# Altium PCB PMI_ActionV2.PcbDoc
Units mm, origin at the board's own origin, x right, y up, seen from the top; angles counter-clockwise.
Board outline 94 x 65 mm, 2 copper layers (Top Layer, Bottom Layer); 78 components, 57 nets, 244 pads, 0 vias.
Unrouted connection lines stored in the file: 173.
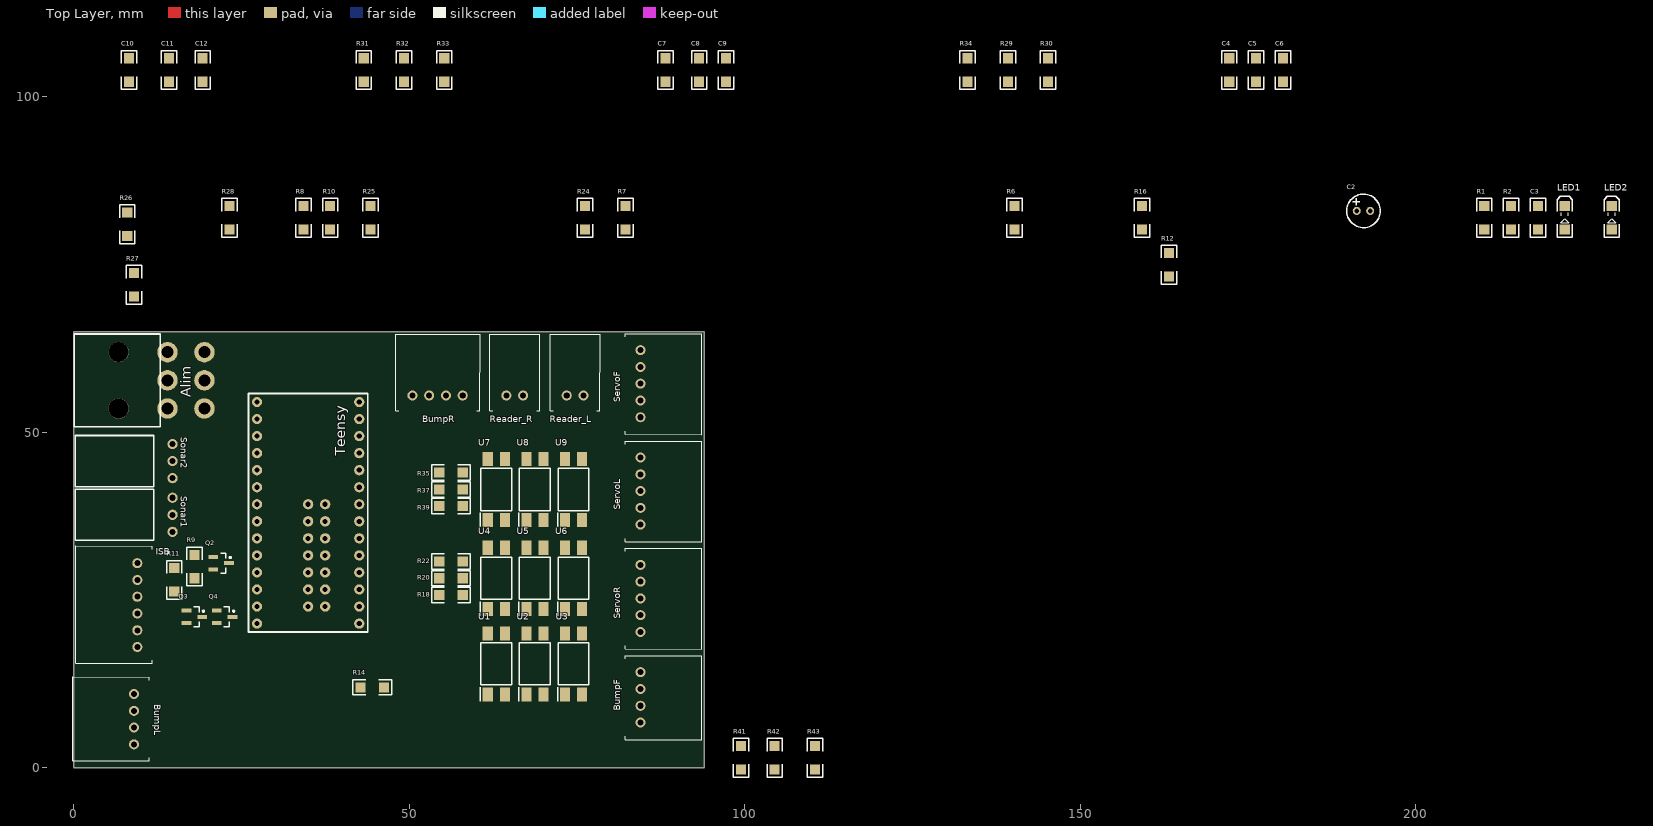
[diagram p0: Top Layer view]
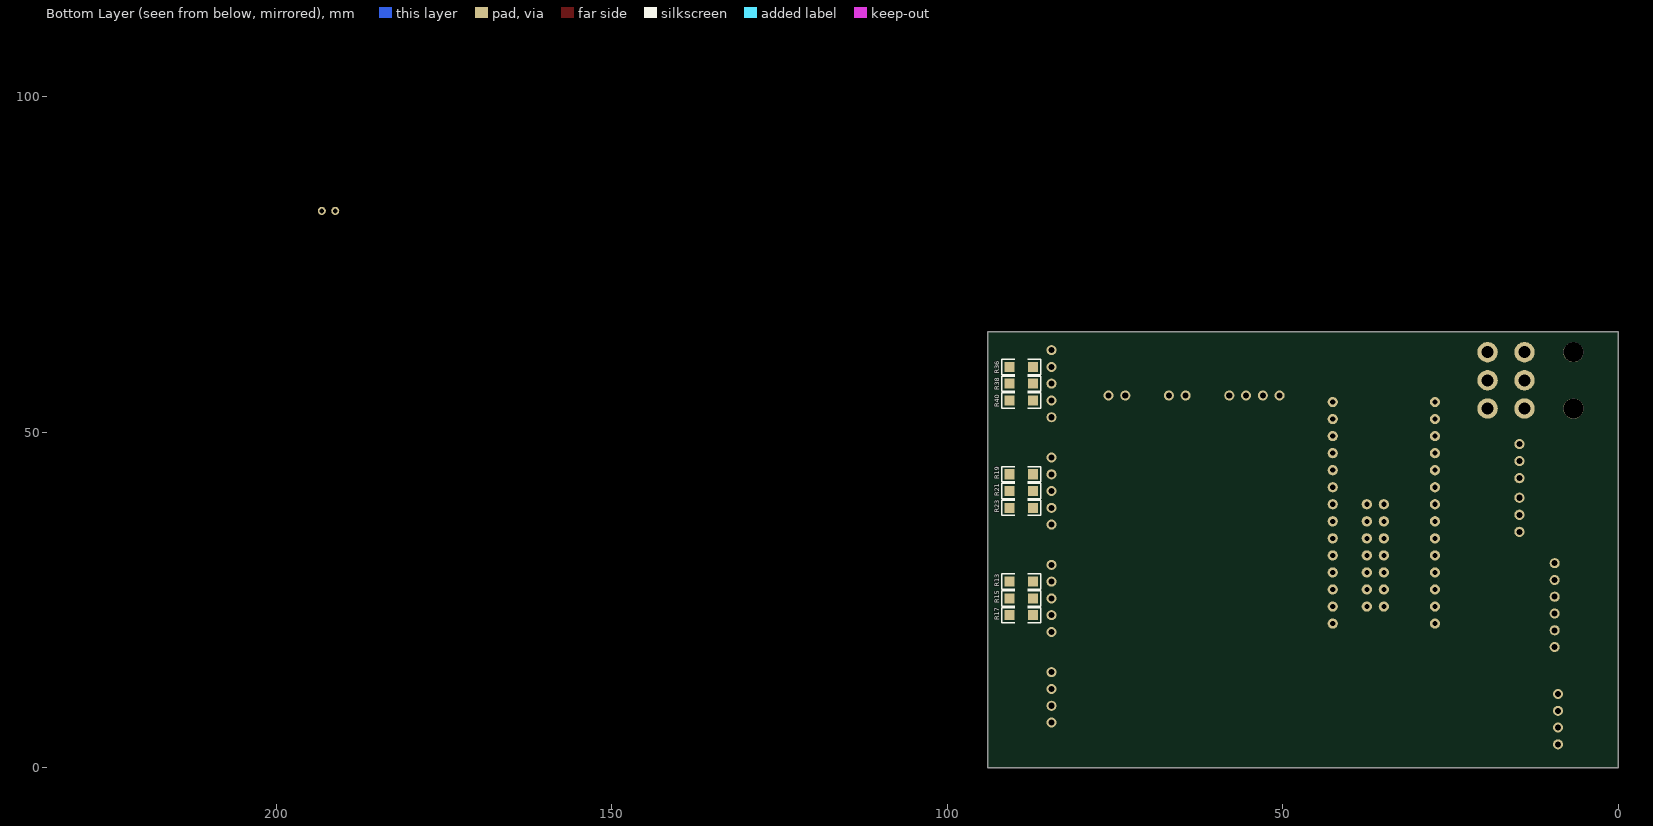
[diagram p1: Bottom Layer view, seen from below]

## Layer stack, top to bottom
Top Solder: solder mask 0.0102, Solder Resist, Dk 3.5
Top Layer: signal copper 0.0356
Dielectric 1: dielectric 0.32, FR-4, Dk 4.8
Bottom Layer: signal copper 0.0356
Bottom Solder: solder mask 0.0102, Solder Resist, Dk 3.5

## Board outline
0,0 0,65 94,65 94,0

## Design rules (kind name [scope] priority, off if disabled: settings)
Clearance [All] p1: gap=0.254
HoleSize [All] p1: absolutevalues=TRUE maxlimit=5 minlimit=0.025 maxpercent=80.000 minpercent=20.000
PolygonConnect [All] p1: connectstyle=Relief reliefconductorwidth=0.254 reliefentries=4 polygonreliefangle="90 Angle" airgapwidth=0.254
RoutingVias [All] p1: holewidth=0.711 width=1.27 viastyle="Through Hole" minholewidth=0.711 minwidth=1.27 maxholewidth=0.711 maxwidth=1.27
SolderMaskExpansion [All] p1: expansion=0.102
Width [All] p1: maxlimit=3 minlimit=0.254 preferedwidth=0.4
29 further rules are at their usual default settings.

## Classes and differential pairs
component class PMI_Action: Alim C2 C3 ISB LED1 LED2 Q2 Q3 Q4 R1 R2 R6 R7 R8 R9 R10 R11 R12 R13 R14 R15 R16 R17 R18 R19 R20 R21 R22 R23 R24 R25 R26 R27 R28 Reader_L Reader_R S1 S2 S3 S4 Sonar1 Sonar2 Teensy U1 U2 U3 U4 U5 U6
component class PMI_Action_bumpers: BumpF BumpL BumpR C4 C5 C6 C7 C8 C9 C10 C11 C12 R29 R30 R31 R32 R33 R34 R35 R36 R37 R38 R39 R40 R41 R42 R43 ServoF ServoL ServoR U7 U8 U9

## Components (designator, comment, footprint, x,y, rotation, side; value= is the part's Value field where it differs from the comment)
Alim "Header 3X2H" MOLEX_MINIFITJR_3X2 14,57.75 r270 top
BumpF "Header 4H" S4B-XH-A 84.5,14.25 r270 top
BumpL "Header 4H" S4B-XH-A 9,3.5 r90 top
BumpR "Header 4H" S4B-XH-A 50.5,55.5 r0 top
C2 "Cap2" Capacitor 191.243,83 r0 top
C3 "(optional)" "Capacitor 1206" 218.243,82 r90 top
C4 "(optional)" "Capacitor 1206" 172.243,104 r90 top
C5 "(optional)" "Capacitor 1206" 176.243,104 r90 top
C6 "(optional)" "Capacitor 1206" 180.243,104 r90 top
C7 "(optional)" "Capacitor 1206" 88.243,104 r90 top
C8 "(optional)" "Capacitor 1206" 93.243,104 r90 top
C9 "(optional)" "Capacitor 1206" 97.243,104 r90 top
C10 "(optional)" "Capacitor 1206" 8.243,104 r90 top
C11 "(optional)" "Capacitor 1206" 14.243,104 r90 top
C12 "(optional)" "Capacitor 1206" 19.243,104 r90 top
ISB "Header 6H" S6B-XH-A 9.5,18 r90 top
LED1 "5V_L" KP-3216SEC 222.243,82 r90 top
LED2 "5V_A" KP-3216SEC 229.243,82 r90 top
Q2 "MOSFET-N" SOT23_M 22,30.5 r0 top
Q3 "MOSFET-N" SOT23_M 18,22.5 r0 top
Q4 "MOSFET-N" SOT23_M 22.5,22.5 r0 top
R1 "Res2" "Resistor 1206" 210.243,82 r90 top
R2 "Res2" "Resistor 1206" 214.243,82 r90 top
R6 "Res2" "Resistor 1206" 140.243,82 r90 top
R7 "Res2" "Resistor 1206" 82.243,82 r90 top
R8 "Res2" "Resistor 1206" 34.243,82 r90 top
R9 "Res2" "Resistor 1206" 18,30 r90 top
R10 "Res2" "Resistor 1206" 38.243,82 r90 top
R11 "Res2" "Resistor 1206" 15,28 r90 top
R12 "Res2" "Resistor 1206" 163.243,75 r90 top
R13 "Res2" "Resistor 1206" 89,27.75 r0 bottom
R14 "Res2" "Resistor 1206" 44.5,12 r0 top
R15 "Res2" "Resistor 1206" 89,25.25 r0 bottom
R16 "Res2" "Resistor 1206" 159.243,82 r90 top
R17 "Res2" "Resistor 1206" 89,22.75 r0 bottom
R18 "Res2" "Resistor 1206" 56.25,25.75 r180 top
R19 "Res2" "Resistor 1206" 89,43.75 r0 bottom
R20 "Res2" "Resistor 1206" 56.25,28.25 r180 top
R21 "Res2" "Resistor 1206" 89,41.25 r0 bottom
R22 "Res2" "Resistor 1206" 56.25,30.75 r180 top
R23 "Res2" "Resistor 1206" 89,38.75 r0 bottom
R24 "Res2" "Resistor 1206" 76.243,82 r90 top
R25 "Res2" "Resistor 1206" 44.243,82 r90 top
R26 "Res2" "Resistor 1206" 8,81 r90 top
R27 "Res2" "Resistor 1206" 9,72 r90 top
R28 "Res2" "Resistor 1206" 23.243,82 r90 top
R29 "Res2" "Resistor 1206" 139.243,104 r90 top
R30 "Res2" "Resistor 1206" 145.243,104 r90 top
R31 "Res2" "Resistor 1206" 43.243,104 r90 top
R32 "Res2" "Resistor 1206" 49.243,104 r90 top
R33 "Res2" "Resistor 1206" 55.243,104 r90 top
R34 "Res2" "Resistor 1206" 133.243,104 r90 top
R35 "Res2" "Resistor 1206" 56.25,44 r180 top
R36 "Res2" "Resistor 1206" 89,59.75 r0 bottom
R37 "Res2" "Resistor 1206" 56.25,41.5 r180 top
R38 "Res2" "Resistor 1206" 89,57.25 r0 bottom
R39 "Res2" "Resistor 1206" 56.25,39 r180 top
R40 "Res2" "Resistor 1206" 89,54.75 r0 bottom
R41 "Res2" "Resistor 1206" 99.493,1.5 r90 top
R42 "Res2" "Resistor 1206" 104.493,1.5 r90 top
R43 "Res2" "Resistor 1206" 110.493,1.5 r90 top
Reader_L "S2B-XH-A" S2B-XH-A 73.5,55.5 r0 top
Reader_R "S2B-XH-A" S2B-XH-A 64.5,55.5 r0 top
ServoF "Header 5H" S5B-XH-A 84.5,62.25 r270 top
ServoL "Header 5H" S5B-XH-A 84.5,46.25 r270 top
ServoR "Header 5H" S5B-XH-A 84.5,30.25 r270 top
Sonar1 "KK254" "MOLEX KK254 3X1H M" 14.75,40.25 r270 top
Sonar2 "KK254" "MOLEX KK254 3X1H M" 14.75,48.25 r270 top
Teensy "Teensy 3.2" Teensy_A_PMI 30.5,53.5 r0 top
U1 "FOD817S" SOP254P1016X385-4N 63,15.5 r90 top
U2 "FOD817S" SOP254P1016X385-4N 68.75,15.5 r90 top
U3 "FOD817S" SOP254P1016X385-4N 74.5,15.5 r90 top
U4 "FOD817S" SOP254P1016X385-4N 63,28.25 r90 top
U5 "FOD817S" SOP254P1016X385-4N 68.75,28.25 r90 top
U6 "FOD817S" SOP254P1016X385-4N 74.5,28.25 r90 top
U7 "FOD817S" SOP254P1016X385-4N 63,41.5 r90 top
U8 "FOD817S" SOP254P1016X385-4N 68.75,41.5 r90 top
U9 "FOD817S" SOP254P1016X385-4N 74.5,41.5 r90 top

## Footprints (in the part's own frame and the unit in brackets; to place one, negate y for a bottom-side part, rotate by r counter-clockwise, add the part's x,y. Pads: shape width x height; smd on the part's side, far side on the other; paste and mask are expansions set on the pad)
Capacitor [mm] "10 - 4.7 uF 2mm"
  round 1.2 hole 0.7: 1(0,0) 2(2,0)
  silkscreen extent -1.5,-2.5 3.5,2.5
"Capacitor 1206" [mm]
  rect 1.5x1.5 smd: 1(-1.75,0) 2(1.75,0)
  silkscreen extent -2.89,-1.14 2.89,1.14, body extent -1.98,-0.99 1.98,0.96, height 1.3
KP-3216SEC [mm]
  rect 1.5x1.5 smd: 1(-1.75,0) 2(1.75,0)
  silkscreen extent -2.89,-1.14 3.2,1.14, body extent -1.7,-0.79 1.5,0.81, height 1.1
"MOLEX KK254 3X1H M" [mil]
  round 60 hole 35.43: 1(0,0) 2(100,0) 3(200,0)
  silkscreen extent -50,-571 250,-110, body extent -50,-570 250,11, height 230
MOLEX_MINIFITJR_3X2 [mm] "MOLEX_MINIFITJR_3X2, 39-30-1060"
  round 3.048 hole 1.8: 1(-4.2,5.5) 2(-4.2,0) 3(0,5.5) 4(0,0) 5(4.2,5.5) 6(4.2,0)
  round 3 hole 3 unplated: 10(-4.2,-7.3) 11(4.2,-7.3)
  silkscreen extent -6.9,-13.9 6.9,-1.1, body extent -6.9,-13.9 7.3,6.04, height 11.41
"Resistor 1206" [mm]
  rect 1.5x1.5 smd: 1(-1.75,0) 2(1.75,0)
  silkscreen extent -2.89,-1.14 2.89,1.14, body extent -1.98,-0.95 1.98,0.93, height 0.55
S2B-XH-A [mm]
  round 1.5 hole 0.9: 1(0,0) 2(2.5,0)
  silkscreen extent -2.45,-2.26 5,9.14, body extent -2.41,-2.32 4.99,9.18, height 6.15
S4B-XH-A [mm]
  round 1.5 hole 0.9: 1(0,0) 2(2.5,0) 3(5,0) 4(7.5,0)
  silkscreen extent -2.45,-2.26 10.08,9.14, body extent -2.44,-2.32 9.96,9.18, height 6.15
S5B-XH-A [mm]
  round 1.5 hole 0.9: 1(0,0) 2(2.5,0) 3(5,0) 4(7.5,0) 5(10,0)
  silkscreen extent -2.45,-2.26 12.58,9.14, body extent -2.45,-2.3 12.45,9.2, height 6.15
S6B-XH-A [mm]
  round 1.5 hole 0.9: 1(0,0) 2(2.5,0) 3(5,0) 4(7.5,0) 5(10,0) 6(12.5,0)
  silkscreen extent -2.45,-2.26 15.08,9.14, body extent -2.45,-2.3 14.95,9.2, height 6.15
SOP254P1016X385-4N [mm]
  rect 2.1x1.5 smd: 1(-4.55,1.27) 2(-4.55,-1.27) 3(4.55,-1.27) 4(4.55,1.27)
  silkscreen extent -5.6,-2.3 3.15,2.37, body extent -3.53,-1.4 3.48,1.44, height 2.21
SOT23_M [mm] "SOT23, 3-Leads, Body 2.9x1.3mm, Pitch 0.95mm, Lead Span 2.3mm - Reverse Pinning, IPC Low Density"
  rect 1.45x0.6 smd: 1(1.175,0) 2(-1.175,-0.95) 3(-1.175,0.95)
  silkscreen extent -0.1,-1.5 1.48,1.5, body extent -0.7,-1.5 0.7,1.5, height 1.1
Teensy_A_PMI [mil]
  round 60 hole 30: 0(-124.41,-59.84) 1(-124.41,-159.84) 2(-124.41,-259.84) 3(-124.41,-359.84) 4(-124.41,-459.84) 5(-124.41,-559.84) 6(-124.41,-659.84) 7(-124.41,-759.84) 8(-124.41,-859.84) 9(-124.41,-959.84) 10(-124.41,-1059.84) 11(-124.41,-1159.84) 12(-124.41,-1259.84) 13(475.59,-1259.84) 14(475.59,-1159.84) 15(475.59,-1059.84) 16(475.59,-959.84) 17(475.59,-859.84) 18(475.59,-759.84) 19(475.59,-659.84) 20(475.59,-559.84) 21(475.59,-459.84) 22(475.59,-359.84) 23(475.59,-259.84) 24(175.59,-759.84) 25(175.59,-859.84) 26(175.59,-959.84) 27(175.59,-1059.84) 28(175.59,-1159.84) 29(275.59,-1159.84) 30(275.59,-1059.84) 31(275.59,-959.84) 32(275.59,-859.84) 33(275.59,-759.84) 36(175.59,-559.84) 37(275.59,-559.84) 39(275.59,-659.84) 40(175.59,-659.84) 41(475.59,-159.84) 42(475.59,-59.84) 43(475.59,40.16) 44(-124.41,40.16)
  silkscreen extent -174,-1310 526,90, body extent -176,-1310 527,147, height 505

## Part data
Alim: "Header, 3-Pin, Dual row, Right Angle"
BumpF BumpL BumpR: "Header, 4-Pin, Right Angle"
C2: "Capacitor"
C3 C4 C5 C6 C7 C8 C9 C10 C11 C12: library part Cap, "Capacitor"
ISB: "Header, 6-Pin, Right Angle"
LED1 LED2: library part LED2, "Typical RED, GREEN, YELLOW, AMBER GaAs LED"
Q2 Q3 Q4: "N-Channel MOSFET"
R1 R2 R6 R7 R8 R9 R10 R11 R12 R13 R14 R15 R16 R17 R18 R19 R20 R21 R22 R23 R24 R25 R26 R27 R28 R29 R30 R31 R32 R33 R34 R35 R36 R37 R38 R39 R40 R41 R42 R43: "Resistor"
Reader_L Reader_R: library part "Header 2H", "Header, 2-Pin, Right Angle"
ServoF ServoL ServoR: "Header, 5-Pin, Right Angle"
Sonar1 Sonar2: library part "Header 3H", "Header, 3-Pin, Right Angle"
Teensy: library part teensy3.2
U1 U2 U3 U4 U5 U6 U7 U8 U9: library part Optoisolator1, "4-Pin Phototransistor Optocoupler"

## Nets (pads, with @x,y where several pads share a name; then routed paths per layer and width w, separated by ;. In a path a pad name is that pad's centre, name@x,y a point inside that pad or via, vN(x,y) a via of type N, cw(c..) or ccw(c..) an arc to the next point about the centre after c; other vN are vias at no path point)
3V_L: Q2.2 Q3.2 Q4.2 R7.2 R9.2 R11.2 Reader_L.1 Reader_R.1 Teensy.41
5V_A: Alim.1 C2.1 LED2.1 ServoF.1 ServoL.1 ServoR.1 U1.4 U2.4 U3.4 U4.4 U5.4 U6.4 U7.4 U8.4 U9.4
5V_L: Alim.2 BumpF.1 BumpL.1 BumpR.1 C3.2 C4.2 C5.2 C6.2 C7.2 C8.2 C9.2 C10.2 C11.2 C12.2 ISB.1 LED1.1 R6.2 R8.2 R10.2 Teensy.43
12V_A: Alim.3
15V_S: Alim.4 Sonar1.1 Sonar2.1
BUMP_1: BumpR.2 C4.1 R34.1 Teensy.0
BUMP_2: BumpR.3 C5.1 R29.1 Teensy.1
BUMP_3: BumpR.4 C6.1 R30.1 Teensy.2
BUMP_4: BumpL.2 C7.1 R31.1 Teensy.3
BUMP_5: BumpL.3 C8.1 R32.1 Teensy.4
BUMP_6: BumpL.4 C9.1 R33.1 Teensy.5
BUMP_7: BumpF.2 C10.1 R41.1 Teensy.19
BUMP_8: BumpF.3 C11.1 R42.1 Teensy.18
BUMP_9: BumpF.4 C12.1 R43.1 Teensy.17
GND_A: Alim.5 C2.2 R2.1 R13.2 R15.2 R17.2 R19.2 R21.2 R23.2 R36.2 R38.2 R40.2 ServoF.5 ServoL.5 ServoR.5
GND_L: Alim.6 C3.1 ISB.6 R1.1 R25.2 R27.2 R28.2 R29.2 R30.2 R31.2 R32.2 R33.2 R34.2 R41.2 R42.2 R43.2 Sonar1.3 Sonar2.3 Teensy.40 Teensy.42 Teensy.44 U1.2 U2.2 U3.2 U4.2 U5.2 U6.2 U7.2 U8.2 U9.2
ISB_CLOCK: ISB.5 Q4.1 R10.1
ISB_LOADING: ISB.3 Q3.1 R8.1
ISB_NEOPIXEL: ISB.2 Q2.1 R6.1
NetLED1_2: LED1.2 R1.2
NetLED2_2: LED2.2 R2.2
NetR12_1: R12.1 U1.1
NetR14_1: R14.1 U2.1
NetR16_1: R16.1 U3.1
NetR18_1: R18.1 U4.1
NetR20_1: R20.1 U5.1
NetR22_1: R22.1 U6.1
NetR35_1: R35.1 U7.1
NetR37_1: R37.1 U8.1
NetR39_1: R39.1 U9.1
SERVO_F1: R36.1 ServoF.2 U7.3
SERVO_F2: R38.1 ServoF.3 U8.3
SERVO_F3: R40.1 ServoF.4 U9.3
SERVO_L1: R19.1 ServoL.2 U4.3
SERVO_L2: R21.1 ServoL.3 U5.3
SERVO_L3: R23.1 ServoL.4 U6.3
SERVO_R1: R13.1 ServoR.2 U1.3
SERVO_R2: R15.1 ServoR.3 U2.3
SERVO_R3: R17.1 ServoR.4 U3.3
SONAR_1: R24.1 Sonar1.2
SONAR_2: R26.1 Sonar2.2
T_ISB_CLOCK: Q4.3 R11.1 Teensy.16
T_ISB_LOADING: Q3.3 R9.1 Teensy.15
T_ISB_NEOPIXEL: Q2.3 R7.1 Teensy.14
T_ISB_SERIAL: ISB.4 Teensy.24
T_R_READING: R28.1 Reader_L.2 Reader_R.2 Teensy.36
T_SERVO_F1: R35.2 Teensy.9
T_SERVO_F2: R37.2 Teensy.10
T_SERVO_F3: R39.2 Teensy.32
T_SERVO_L1: R18.2 Teensy.21
T_SERVO_L2: R20.2 Teensy.20
T_SERVO_L3: R22.2 Teensy.6
T_SERVO_R1: R12.2 Teensy.25
T_SERVO_R2: R14.2 Teensy.23
T_SERVO_R3: R16.2 Teensy.22
T_SONAR_1: R24.2 R25.1 Teensy.27
T_SONAR_2: R26.2 R27.1 Teensy.26
pads on no net: Alim.10 Alim.11 Teensy.7 Teensy.8 Teensy.11 Teensy.12 Teensy.13 Teensy.28 Teensy.29 Teensy.30 Teensy.31 Teensy.33 Teensy.37 Teensy.39